# Altium PCB Main.PcbDoc (part 2 of 2)
Units mm, origin at the board's own origin, x right, y up, seen from the top; angles counter-clockwise.
Board outline 40.1 x 80 mm, 2 copper layers (Top Layer, Bottom Layer), stack 1.569 mm thick; 50 components, 61 nets, 238 pads, 201 vias.
Unrouted connection lines stored in the file: 3.
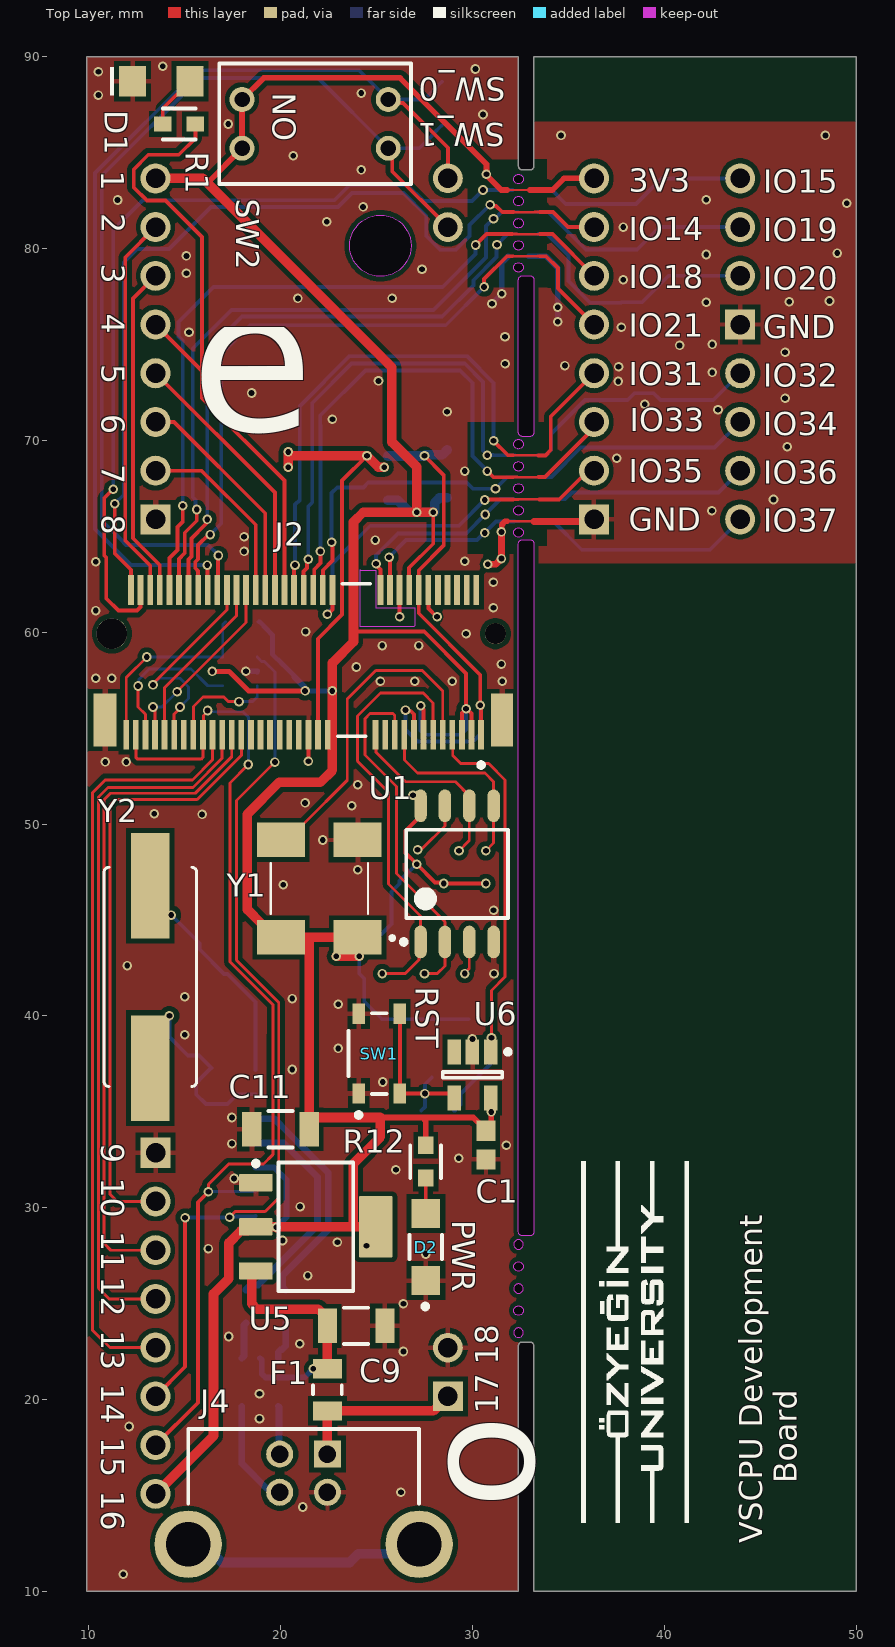
[diagram p0: Top Layer view]

## Via types
v1: diameter 0.5, hole 0.3, Top Layer to Bottom Layer, 201 vias

## Nets (pads, with @x,y where several pads share a name; then routed paths per layer and width w, separated by ;. In a path a pad name is that pad's centre, name@x,y a point inside that pad or via, vN(x,y) a via of type N, cw(c..) or ccw(c..) an arc to the next point about the centre after c; other vN are vias at no path point) (continued)
VSCPU_RST: (continued)
  Bottom Layer w0.15: v1@13.346,57.276 13.67,57.6 14.754,57.6 15.204,57.15 15.204,56.55 v1(14.754,56.1)
  Bottom Layer w0.2: v1(13.346,57.25) v1@13.346,57.276
VSCPU_RX: J2.71 U7.4 | length 8
  Top Layer w0.15: v1(12.57,57.193) 12.57,56.098 12.95,55.718 J2.71
  Bottom Layer w0.15: v1@12.605,57.228 12.605,57.535 13.152,58.082 15.323,58.082 16.2,57.205 U7.4
  Bottom Layer w0.2: v1(12.57,57.193) v1@12.605,57.228
pads on no net: J2. J2.2 J2.4 J2.6 J2.8 J2.10 J2.39 J2.41 J2.43 J2.45 J2.47 U3.9 U3.10 U3.11 U3.12 U3.13 U3.14 U3.15 U6.3

## Polygon pours and split planes (outlines as drawn)
GND on Top Layer "NONET_L-01_P-001" (solid, remove dead copper, pour order 6): 33.2,86.6 33.2,84.692 33.9,84.692 33.9,77.95 33.2,77.95 33.2,70.959 33.896,70.959 33.899,70.957 33.899,64.491 33.202,64.491 33.202,63.6 50,63.6 50,86.6
GND on Top Layer "NONET_L-01_P-001" (solid, remove dead copper, pour order 3): 9.9,10 32.4,10 32.4,64.061 29.74,64.061 29.74,70.959 32.4,70.959 32.4,71.104 32.4,77.95 29.74,77.95 29.74,84.66 32.4,84.66 32.4,90 9.9,90
GND on Bottom Layer "NONET_L-01_P-001" (solid, remove dead copper, pour order 5): 33.2,86.6 33.2,84.692 33.9,84.692 33.9,77.95 33.2,77.95 33.2,70.959 33.896,70.959 33.899,70.957 33.899,63.6 50,63.6 50,86.6
GND on Bottom Layer "NONET_L-01_P-001" (solid, remove dead copper, pour order 1): 9.9,10 32.4,10 32.4,64.061 29.752,64.061 29.752,70.959 32.4,70.959 32.4,71.104 32.4,77.95 29.752,77.95 29.752,84.66 32.4,84.66 32.4,90 9.9,90

## Keep-outs
Top Layer:
  region: 24.15,63.25 24.171,63.229 24.963,63.229 24.963,61.28 24.964,61.278 26.995,61.278 26.995,60.344 26.951,60.28 24.163,60.28

## Silkscreen, mask and mechanical layers (free items; w line width, h text height)
Top Overlay:
  drawing of 23 lines, arcs and shapes, not listed
  text "SW_0" at 31.746,88.906 h1.2 r180
  text "SW_1" at 31.684,86.536 h1.2 r180
  text "1" at 10.654,84.046 h1.2 r270
  text "3V3" at 38.154,82.974 h1.2
  text "IO15" at 45.154,82.914 h1.2
  text "2" at 10.668,81.829 h1.2 r270
  text "IO14" at 38.154,80.447 h1.2
  text "IO19" at 45.154,80.387 h1.2
  text "3" at 10.668,79.213 h1.2 r270
  text "IO18" at 38.154,77.92 h1.2
  text "IO20" at 45.154,77.86 h1.2
  text "4" at 10.668,76.596 h1.2 r270
  text "IO21" at 38.154,75.392 h1.2
  text "GND" at 45.154,75.332 h1.2
  text "5" at 10.668,73.979 h1.2 r270
  text "IO31" at 38.154,72.865 h1.2
  text "IO32" at 45.154,72.805 h1.2
  text "6" at 10.668,71.363 h1.2 r270
  text "IO33" at 38.205,70.484 h1.2
  text "IO34" at 45.154,70.278 h1.2
  text "7" at 10.668,68.746 h1.2 r270
  text "IO35" at 38.154,67.811 h1.2
  text "IO36" at 45.154,67.751 h1.2
  text "e" at 15.309,67.1 h18
  text "8" at 10.668,66.13 h1.2 r270
  text "GND" at 38.154,65.284 h1.2
  text "IO37" at 45.154,65.224 h1.2
  text "RST" at 27.054,41.516 h1.2 r270
  text "9" at 10.654,33.346 h1.2 r270
  text "10" at 10.654,31.56 h1.2 r270
  text "PWR" at 28.954,29.346 h1.2 r270
  text "11" at 10.654,28.774 h1.2 r270
  text "12" at 10.654,26.389 h1.2 r270
  text "13" at 10.654,23.603 h1.2 r270
  text "18" at 31.336,21.8 h1.2 r90
  text "14" at 10.654,20.817 h1.2 r270
  text "17" at 31.336,19.26 h1.2 r90
  text "15" at 10.654,18.032 h1.2 r270
  text "16" at 10.654,15.246 h1.2 r270
  text "o" at 35.1,14.3 h10 r90
  text "VSCPU Development /       Board" at 46.9,12.5 h1.2 r90
Bottom Overlay:
  lines w0.37: 18.205,73.871 18.346,73.446 ; 18.771,73.305 18.346,73.446 ; 19.054,74.154 18.346,73.446
  text "3V3" at 23.246,88.279 h1.2
  text "IO16" at 23.246,86.161 h1.2
  text "IO17" at 23.616,84.154 h1.2
  text "IO30" at 23.246,81.926 h1.2
  text "IO29" at 23.146,79.646 h1.2
  text "IO28" at 23.146,77.854 h1.2
  text "IO27" at 23.246,75.572 h1.2
  text "GND" at 23.246,73.454 h1.2
  text "Designed by  / Ebubekir Tasci" at 10.1,36.7 h1.2 r270
  text "GND" at 30.319,24.754 h1.2
  text "5V" at 29.72,16.754 h1.2
Mechanical 1:
  circle w0.01: c32.4,23.48 r0.25
  circle w0.01: c32.4,24.63 r0.25
  circle w0.01: c32.4,25.78 r0.25
  circle w0.01: c32.4,28.08 r0.25
  circle w0.01: c32.4,26.93 r0.25
  circle w0.01: c32.4,68.65 r0.25
  circle w0.01: c32.4,69.8 r0.25
  circle w0.01: c32.4,67.5 r0.25
  circle w0.01: c32.4,66.35 r0.25
  circle w0.01: c32.4,65.2 r0.25
  circle w0.01: c32.4,79.02 r0.25
  circle w0.01: c32.4,80.17 r0.25
  circle w0.01: c32.4,81.32 r0.25
  circle w0.01: c32.4,83.62 r0.25
  circle w0.01: c32.4,82.47 r0.25
  lines w0.01: 32.394,21.691 32.394,22.791 cw(c32.594,22.791) 32.594,22.991 32.994,22.991 cw(c32.994,22.791) 33.194,22.791 33.194,21.691 ; 32.4,86 32.4,84.3 ccw(c32.6,84.3) 32.6,84.1 33,84.1 ccw(c33,84.3) 33.2,84.3 33.2,86 ; 32.399,28.731 ccw(c32.599,28.731) 32.599,28.531 33.003,28.531 ccw(c33.003,28.731) 33.203,28.731 33.203,64.622 ccw(c33.003,64.622) 33.003,64.822 32.599,64.822 ccw(c32.599,64.622) 32.399,64.622 32.399,28.731 ; 32.4,70.4 ccw(c32.6,70.4) 32.6,70.2 33.004,70.2 ccw(c33.004,70.4) 33.204,70.4 33.204,78.384 ccw(c33.004,78.384) 33.004,78.584 32.6,78.584 ccw(c32.6,78.384) 32.4,78.384 32.4,70.4

## Text inside footprints (layer, text, board x,y; h text height)
SW2: Top Overlay "ON" at 20.8,85.6 h1.2 r90; Top Component Outline "2" at 24.6,87.4 h1.2 r90; Top Component Outline "ON" at 20,84.43 h1.2 r90; Top Component Outline "1" at 24.6,85 h1.2 r90